# Altium PCB Solar_950_test.PcbDoc
Units mm, origin at the board's own origin, x right, y up, seen from the top; angles counter-clockwise.
Board outline 75 x 60 mm, 2 copper layers (Top Layer, Bottom Layer), stack 1.071 mm thick; 43 components, 17 nets, 105 pads, 2 vias.
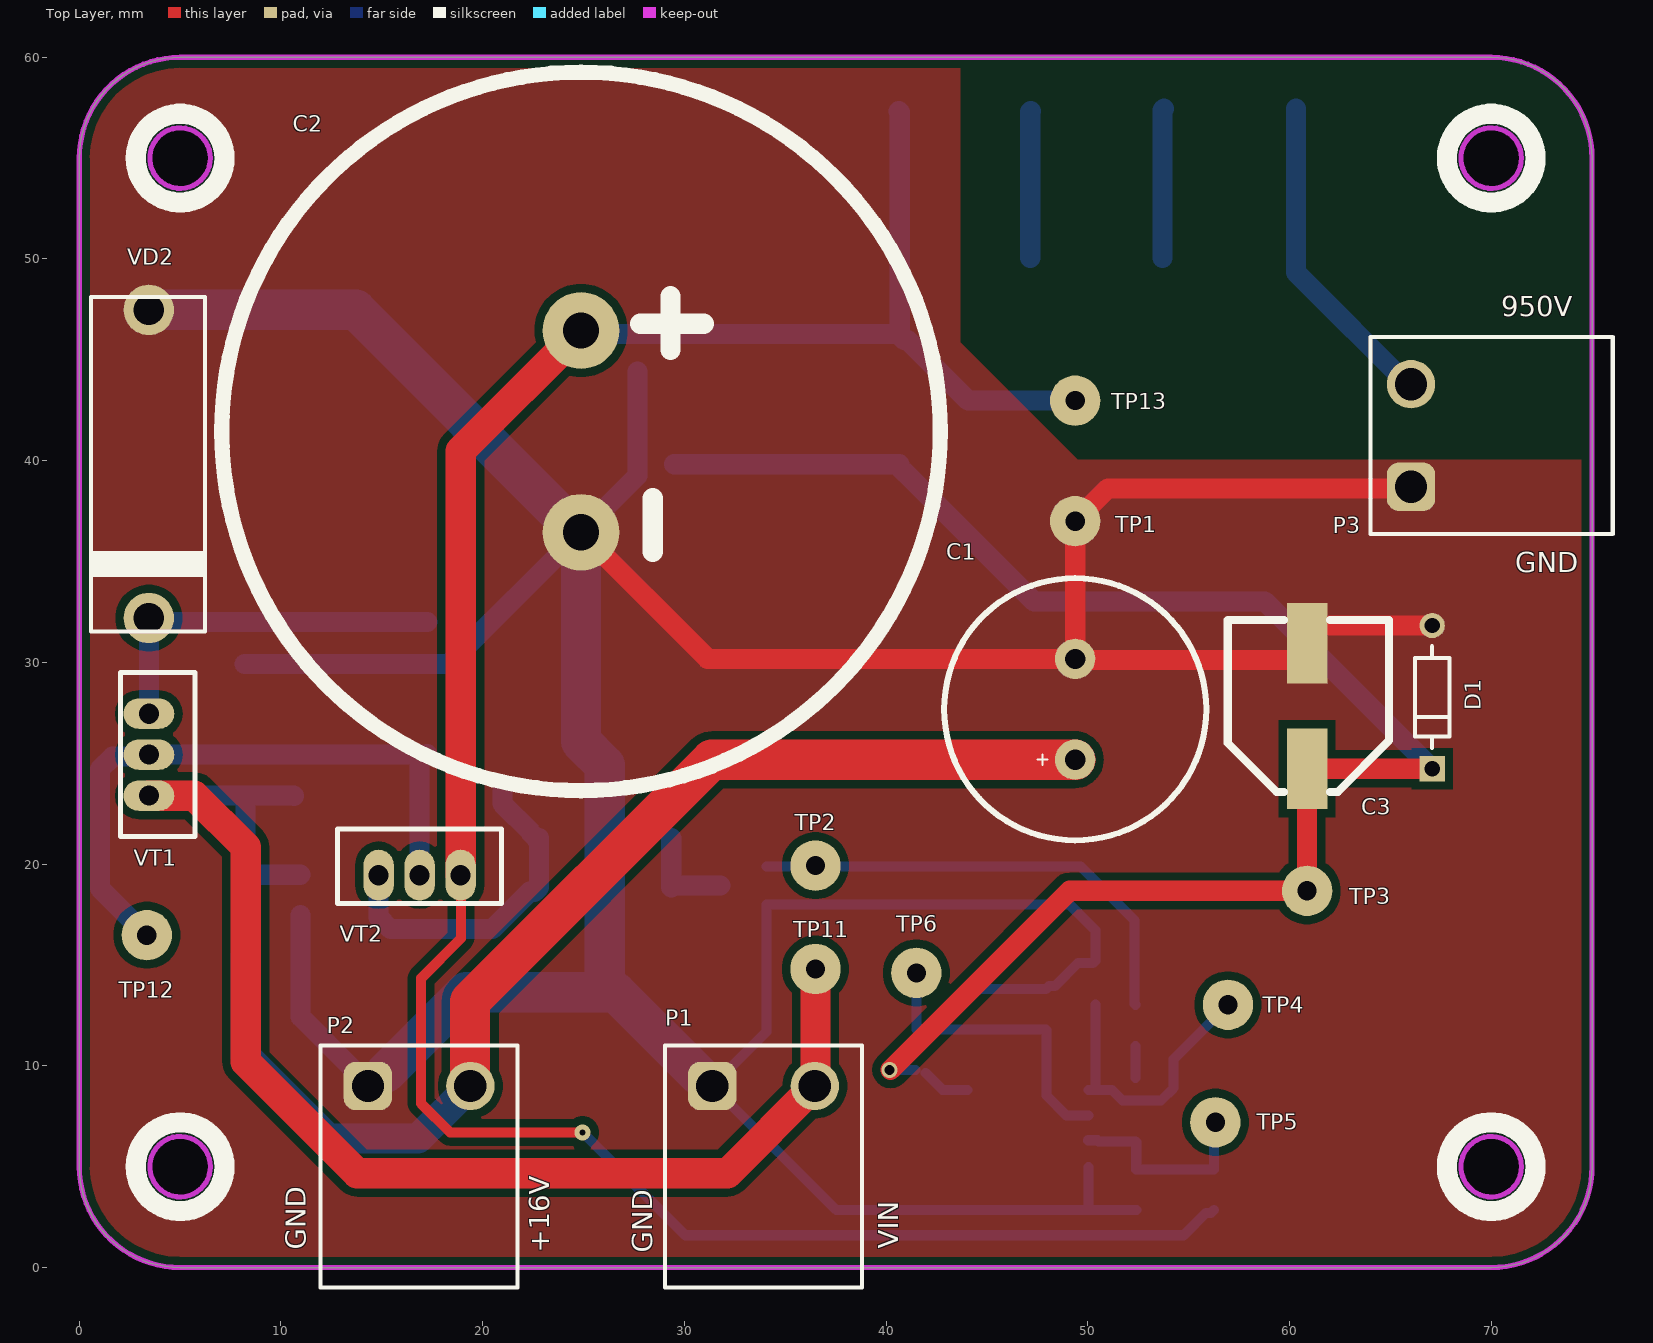
[diagram p0: Top Layer view]
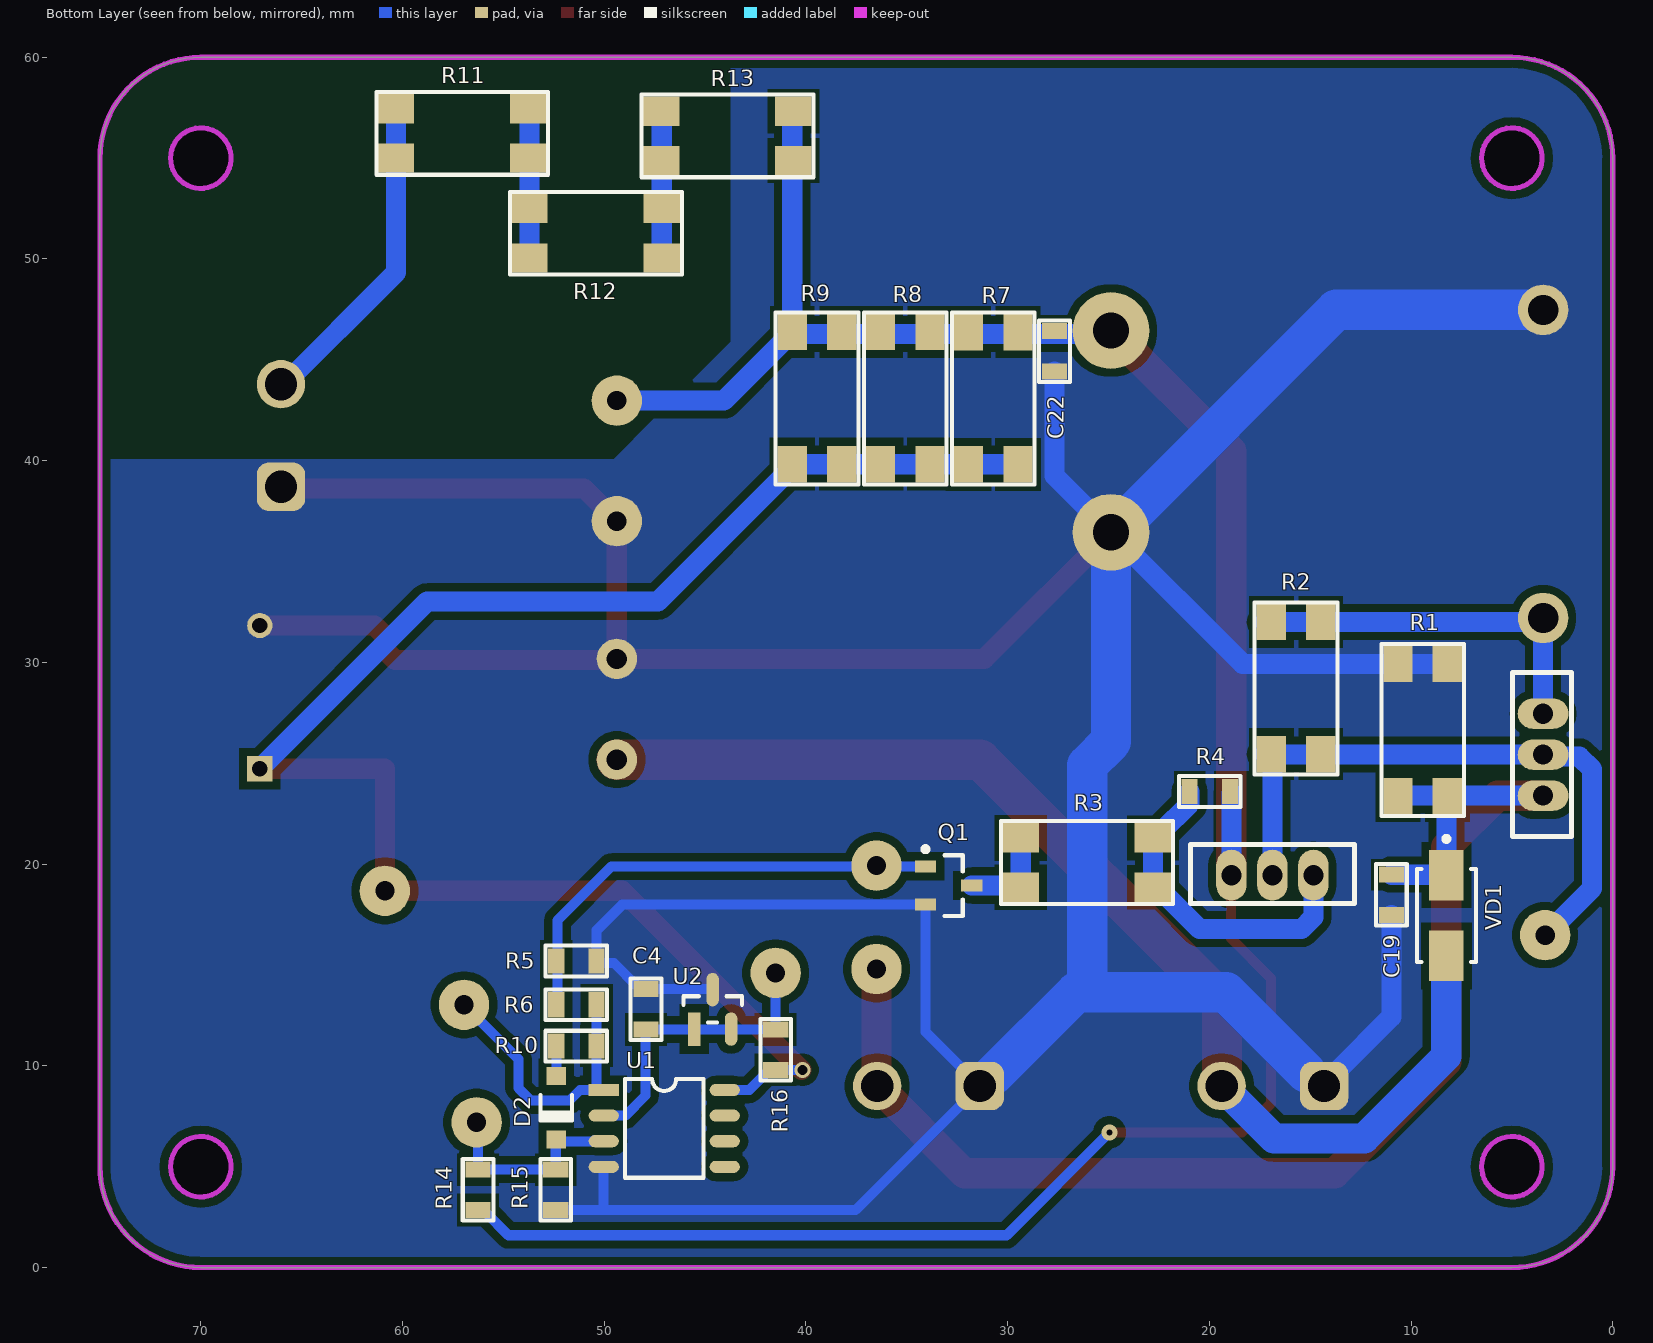
[diagram p1: Bottom Layer view, seen from below]
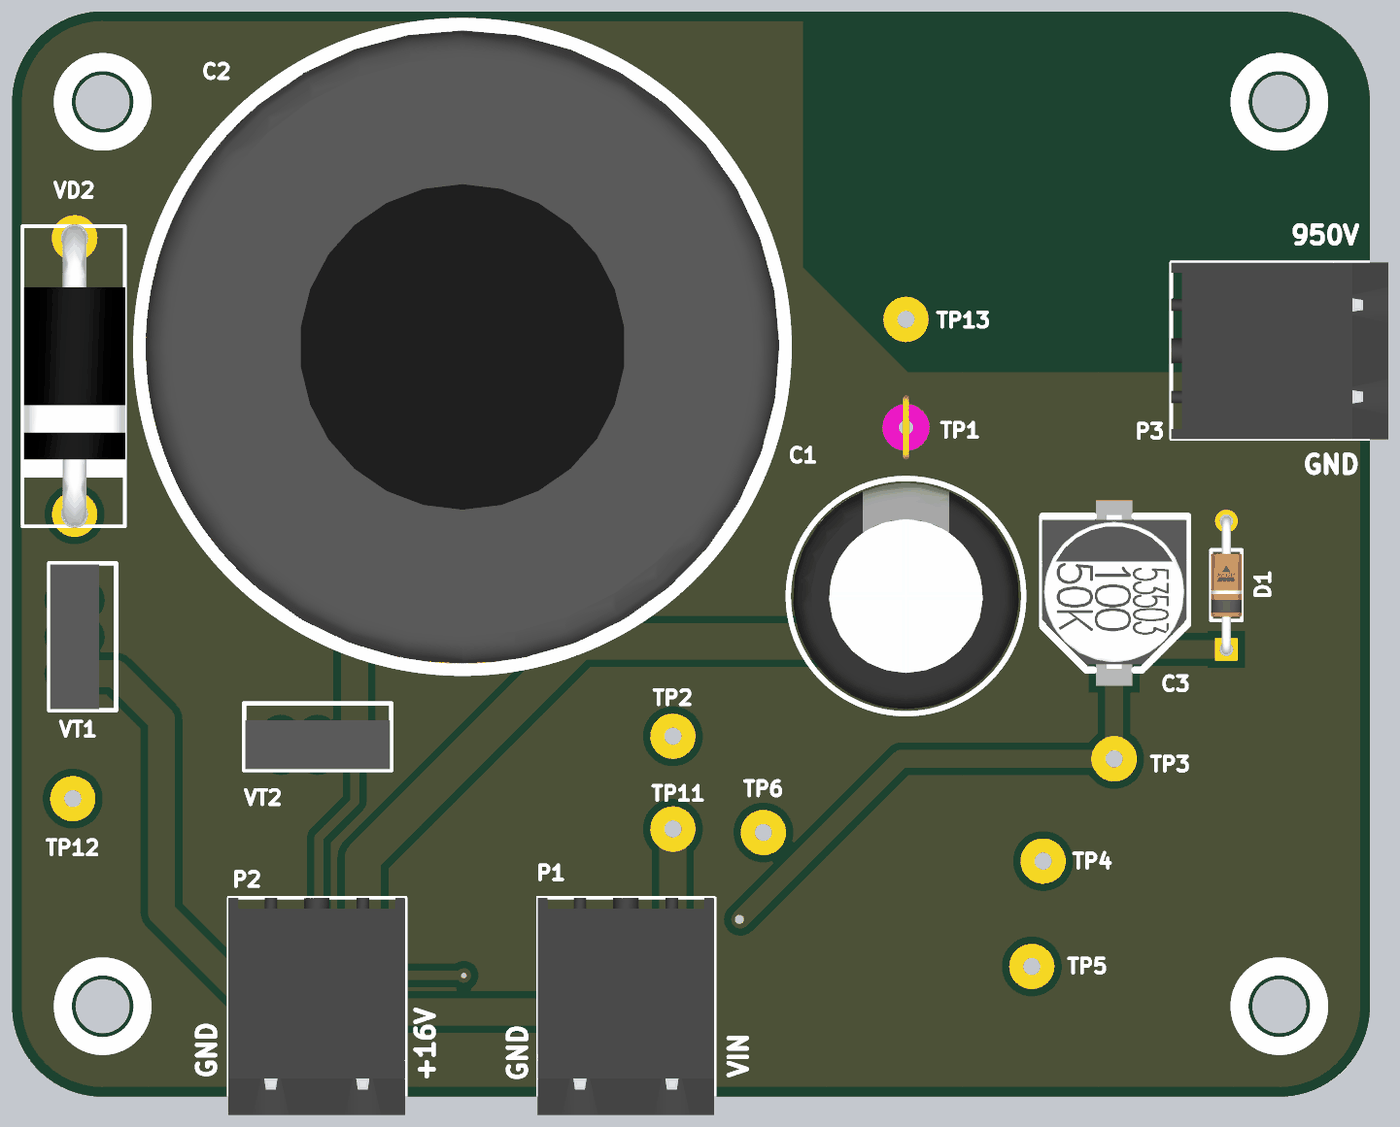
[diagram p2: 3D render of the assembled board from above, using the file's embedded part models]
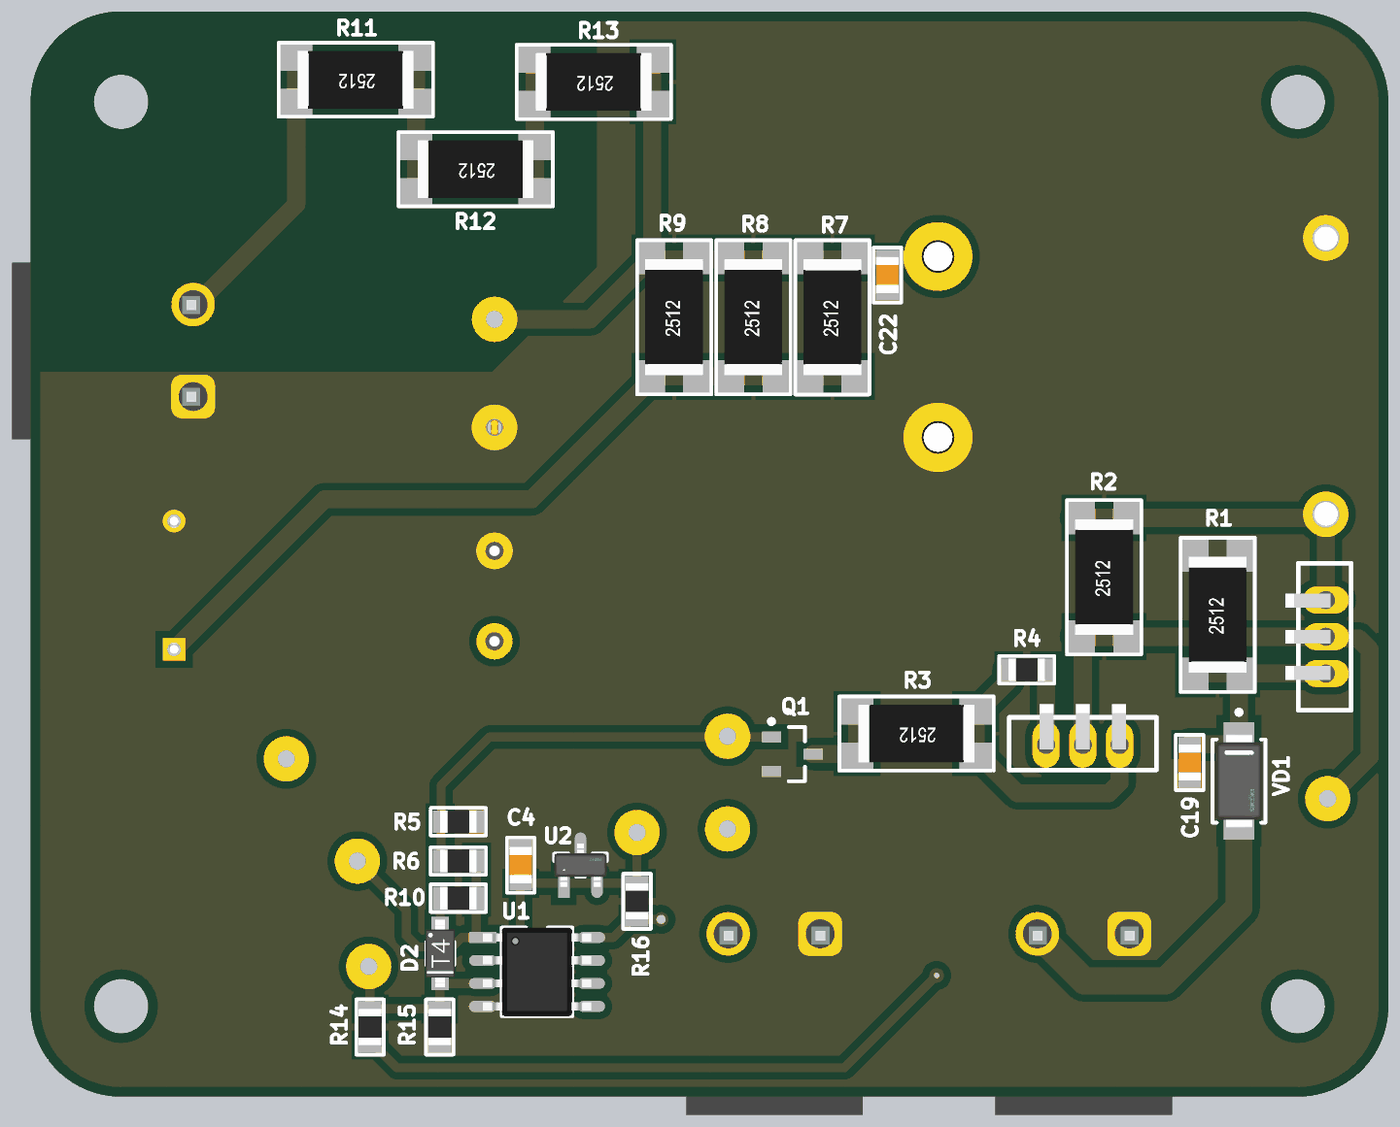
[diagram p3: 3D render of the assembled board from below, using the file's embedded part models]

## Layer stack, top to bottom
Top Solder: solder mask 0.0102, Solder Resist, Dk 3.5
Top Layer: signal copper 0.0356
Dielectric 1: dielectric 1, FR-4, Dk 4.8
Bottom Layer: signal copper 0.0356
Bottom Solder: solder mask 0.0102, Solder Resist, Dk 3.5

## Board outline
0,5 ccw(c5,5) 5,0 70,0 ccw(c70,5) 75,5 75,4.95 75,55 ccw(c70,55) 70,60 5,60 ccw(c5,55) 0,55
cut-out: 68.5,55 ccw(c70,55) 70,53.5 ccw(c70,55) 71.5,55 ccw(c70,55) 70,56.5 ccw(c70,55)
cut-out: 68.5,5 ccw(c70,5) 70,3.5 ccw(c70,5) 71.5,5 ccw(c70,5) 70,6.5 ccw(c70,5)
cut-out: 4.996,53.496 cw(c4.996,54.996) 3.496,54.996 cw(c4.996,54.996) 4.996,56.496 cw(c4.996,54.996) 6.496,54.996 cw(c4.996,54.996)
cut-out: 3.5,5 ccw(c5,5) 5,3.5 ccw(c5,5) 6.5,5 ccw(c5,5) 5,6.5 ccw(c5,5)

## Design rules (kind name [scope] priority, off if disabled: settings)
Clearance Clearance_1 [All vs InNet('GND_1')] p1: gap=0.2 ignorepadtopadclearanceinfootprint=FALSE
Clearance [All vs InNet('GND')] p2: gap=0.4 ignorepadtopadclearanceinfootprint=FALSE except(0.2: Arc-Hole Text-Text Text-Hole)
ComponentClearance [All] p1: gap=-3 collisioncheckmode=3 verticalgap=0.254 showdistances=FALSE
DiffPairsRouting [All] p1: maxlimit=0.254 minlimit=0.254 mostfreqgap=0.254 substack1={A23D90DD-733B-49C5-8102-56B3D284E3A0} toplayer_{a23d90dd-733b-49c5-8102-56b3d284e3a0}_minwidth=0.381 toplayer_{a23d90dd-733b-49c5-8102-56b3d284e3a0}_maxwidth=0.381 toplayer_{a23d90dd-733b-49c5-8102-56b3d284e3a0}_prefwidth=0.381 bottomlayer_{a23d90dd-733b-49c5-8102-56b3d284e3a0}_minwidth=0.381 bottomlayer_{a23d90dd-733b-49c5-8102-56b3d284e3a0}_maxwidth=0.381 bottomlayer_{a23d90dd-733b-49c5-8102-56b3d284e3a0}_prefwidth=0.381 toplayer_minwidth=0.381 toplayer_maxwidth=0.381 toplayer_prefwidth=0.381 bottomlayer_minwidth=0.381 bottomlayer_maxwidth=0.381 bottomlayer_prefwidth=0.381 substack2={0B3DB408-A969-412D-8C07-BA8AE97219D9} toplayer_{0b3db408-a969-412d-8c07-ba8ae97219d9}_minwidth=0.381 toplayer_{0b3db408-a969-412d-8c07-ba8ae97219d9}_maxwidth=0.381 toplayer_{0b3db408-a969-412d-8c07-ba8ae97219d9}_prefwidth=0.381 bottomlayer_{0b3db408-a969-412d-8c07-ba8ae97219d9}_minwidth=0.381 bottomlayer_{0b3db408-a969-412d-8c07-ba8ae97219d9}_maxwidth=0.381 bottomlayer_{0b3db408-a969-412d-8c07-ba8ae97219d9}_prefwidth=0.381 substack3={378827E6-B38F-4565-9D2F-710D8D441C30} toplayer_{378827e6-b38f-4565-9d2f-710d8d441c30}_minwidth=0.381 toplayer_{378827e6-b38f-4565-9d2f-710d8d441c30}_maxwidth=0.381 toplayer_{378827e6-b38f-4565-9d2f-710d8d441c30}_prefwidth=0.381 bottomlayer_{378827e6-b38f-4565-9d2f-710d8d441c30}_minwidth=0.381 bottomlayer_{378827e6-b38f-4565-9d2f-710d8d441c30}_maxwidth=0.381 bottomlayer_{378827e6-b38f-4565-9d2f-710d8d441c30}_prefwidth=0.381 substack4={1E65D4A7-266F-4925-B814-5E9C4A66F8EE} toplayer_{1e65d4a7-266f-4925-b814-5e9c4a66f8ee}_minwidth=0.381 toplayer_{1e65d4a7-266f-4925-b814-5e9c4a66f8ee}_maxwidth=0.381 toplayer_{1e65d4a7-266f-4925-b814-5e9c4a66f8ee}_prefwidth=0.381 bottomlayer_{1e65d4a7-266f-4925-b814-5e9c4a66f8ee}_minwidth=0.381 bottomlayer_{1e65d4a7-266f-4925-b814-5e9c4a66f8ee}_maxwidth=0.381 bottomlayer_{1e65d4a7-266f-4925-b814-5e9c4a66f8ee}_prefwidth=0.381 substack5={93C5D03E-862D-45F8-9871-970EEA9B3F11} toplayer_{93c5d03e-862d-45f8-9871-970eea9b3f11}_minwidth=0.381 toplayer_{93c5d03e-862d-45f8-9871-970eea9b3f11}_maxwidth=0.381 toplayer_{93c5d03e-862d-45f8-9871-970eea9b3f11}_prefwidth=0.381 bottomlayer_{93c5d03e-862d-45f8-9871-970eea9b3f11}_minwidth=0.381 bottomlayer_{93c5d03e-862d-45f8-9871-970eea9b3f11}_maxwidth=0.381 bottomlayer_{93c5d03e-862d-45f8-9871-970eea9b3f11}_prefwidth=0.381 maxuncoupledlength=12.7
Height [All] p1: minheight=0 maxheight=80 prefheight=33
HoleSize [All] p1: absolutevalues=TRUE maxlimit=6 minlimit=0.01 maxpercent=80.000 minpercent=20.000
HoleToHoleClearance [All] p1: gap=0.1 allowstackedmicrovias=TRUE
MinimumSolderMaskSliver [All] p1: minsoldermaskwidth=0.1
PlaneClearance [All] p1: clearance=0.7
PlaneConnect [All] p1: planeconnectstyle=Direct reliefexpansion=0.5 reliefentries=4 reliefconductorwidth=0.5 reliefairgap=0.15
PolygonConnect VQFN20 [HasFootprint('VQFN20')] p1: connectstyle=Direct reliefconductorwidth=0.254 reliefentries=4 polygonreliefangle="90 Angle" airgapwidth=0.254
PolygonConnect [All] p2: connectstyle=Direct reliefconductorwidth=0.3 reliefentries=4 polygonreliefangle="90 Angle" airgapwidth=0.15
RoutingVias [All] p1: holewidth=0.1 width=0.1 viastyle="Through Hole" minholewidth=0 minwidth=0.3 maxholewidth=2 maxwidth=4
ShortCircuit [All] p1: allowed=TRUE
SilkToSolderMaskClearance [IsPad] p1: minsilkscreentomaskgap=0.1 clearancetoexposedcopper=TRUE
SolderMaskExpansion SolderMaskExpansion_Via [IsVia] p1: expansion=0.102 istentingtop=TRUE
SolderMaskExpansion [All] p2: expansion=0.01 istentingtop=FALSE
UnRoutedNet [All] p1: checkbadconnections=TRUE
Width [All] p1: maxlimit=5 minlimit=0.2 preferedwidth=0.3 substack1={A23D90DD-733B-49C5-8102-56B3D284E3A0} substack2={0B3DB408-A969-412D-8C07-BA8AE97219D9} substack3={378827E6-B38F-4565-9D2F-710D8D441C30} substack4={1E65D4A7-266F-4925-B814-5E9C4A66F8EE} substack5={93C5D03E-862D-45F8-9871-970EEA9B3F11}
19 further rules are at their usual default settings.

## Components (designator, comment, footprint, x,y, rotation, side; value= is the part's Value field where it differs from the comment)
C1 "1000uF 25V" CAPPOL-12x25 49.375,27.675 r90 top
C2 "4700uF_100V" CAPPOL_35x60 24.875,41.45 r270 top locked
C3 "1000uF_10V" CAP_SMD_Size_E 60.875,27.902 r270 top
C4 "1uF_16V" CAP-0805 47.925,12.8 r270 bottom
C19 "1uF_50V" CAP-0805 10.975,18.475 r270 bottom
C22 "1uF 100V" CAP-0805 27.675,45.425 r90 bottom
D1 "5,6V" FP-SB-V-3906_04-031_4-MFG 67.075,28.275 r90 top
D2 "1N4148" DIOD-SOD123-2_V 52.375,7.919 r270 bottom
P1 "691701530002B" 691701530002B 33.925,5 r0 top
P2 "691701530002B" 691701530002B 16.85,5 r0 top
P3 "691701530002B" 691701530002B 70.025,41.25 r90 top locked
Q1 "MMBT5551" INF-SOT23_N 32.925,18.938 r180 bottom
R1 "100**" RES-2512 9.425,26.65 r90 bottom
R2 "100" RES-2512 15.7,28.725 r90 bottom
R3 "1K" RES-2512 26.075,20.075 r0 bottom
R4 "10K" RES-0805 19.975,23.6 r0 bottom
R5 "20K" RES-0805 51.375,15.2 r180 bottom
R6 "1K" RES-0805 51.375,13.026 r0 bottom
R7 "10K" RES-2512 30.714,43.095 r90 bottom
R8 "10K" RES-2512 35.075,43.1 r90 bottom
R9 "10K" RES-2512 39.45,43.1 r90 bottom
R10 "10K" RES-0805 51.375,10.975 r180 bottom
R11 "100K" RES-2512 57.05,56.225 r0 bottom
R12 "100K" RES-2512 50.425,51.275 r0 bottom
R13 "100K" RES-2512 43.9,56.1 r0 bottom
R14 "100K" RES-0805 56.25,3.85 r270 bottom
R15 "3K9" RES-0805 52.4,3.85 r90 bottom
R16 "1K" RES-0805 41.5,10.8 r270 bottom
TP1 "Test_Point_PCB" Pin_Test_Point(Pink) 49.375,37 r0 top
TP2 "Test_Point_PCB" Test_Point 36.5,19.925 r0 top
TP3 "Test_Point_PCB" Test_Point 60.875,18.675 r0 top
TP4 "Test_Point_PCB" Test_Point 56.95,13.025 r0 top
TP5 "Test_Point_PCB" Test_Point 56.325,7.2 r0 top
TP6 "Test_Point_PCB" Test_Point 41.5,14.604 r0 top
TP11 "" Test_Point 36.5,14.8 r90 top
TP12 "Test_Point_PCB" Test_Point 3.35,16.475 r90 top
TP13 "Test_Point_PCB" Test_Point 49.375,42.975 r90 top
U1 "LM358DRG" SO8-150 47.025,6.9 r180 bottom
U2 "" TL431_SOT-23-3(A) 44.625,12.798 r90 bottom
VD1 "US1G" US1G_SMA 8.25,17.45 r270 bottom
VD2 "18V" DO-201 3.45,39.95 r90 top
VT1 "BD139(npn)" TO-126 3.45,25.425 r90 top
VT2 "BD140(pnp)" TO-126 16.875,19.45 r180 top

## Footprints (in the part's own frame and the unit in brackets; to place one, negate y for a bottom-side part, rotate by r counter-clockwise, add the part's x,y. Pads: shape width x height; smd on the part's side, far side on the other; paste and mask are expansions set on the pad)
691701530002B [mm] "THR - 5,08mm - PCB Horizontal Open - 02p"
  rrect50% 2.4x2.4 hole 1.6: 1(-2.54,4)
  round 2.4 hole 1.6: 2(2.54,4)
  silkscreen extent -4.88,-6 4.88,6, body extent -4.9,-6 4.86,6, height 8.6
CAP-0805 [mm]
  rect 0.8x1.25 smd mask+0.015: 1(-1,0) 2(1,0)
  silkscreen extent -1.52,-0.76 1.52,0.76, body extent -1,-0.62 1,0.63, height 0.8
CAP_SMD_Size_E [mm]
  rect 4x2 smd: 1(3.175,0) 2(-3.048,0)
  silkscreen extent -4.19,-3.94 4.32,4.06, body extent -4.25,-4 4.25,4, height 10.59
CAPPOL-12x25 [mm]
  round 2 hole 1: 1(-2.5,0) 2(2.5,0)
  silkscreen extent -6.5,-6.5 6.5,6.5, body extent -6.25,-6.25 6.25,6.25, height 25
CAPPOL_35x60 [mm]
  round 3.8 hole 1.8: 1(-5,0) 2(5,0)
  silkscreen extent -17.81,-17.81 17.81,17.81, body extent -17.5,-17.5 17.51,17.5, height 60
DIOD-SOD123-2_V [mm] "SOD123, 2-Leads, Body 2.7x1.55mm, Height 1.45mm"
  rect 0.9x0.95 smd: 1(1.575,0) 2(-1.575,0)
  silkscreen extent -0.64,-0.83 0.64,0.77, body extent -1.88,-0.8 1.88,0.8, height 1.3
DO-201 [mm]
  round 2.5 hole 1.5: 1(-7.75,0) 2(7.525,0)
  silkscreen extent -8.42,-2.78 8.18,2.88, body extent -8.4,-2.79 8.16,2.79, height 7.6
FP-SB-V-3906_04-031_4-MFG [mm]
  rect 1.25x1.25 hole 0.75 paste-2539.97 mask+0: 1(-3.55,0)
  round 1.25 hole 0.75 paste-2539.97 mask+0: 2(3.55,0)
  silkscreen extent -2.52,-0.85 2.52,0.85, body extent -4.28,-0.95 4.28,0.95, height 0.25
INF-SOT23_N [mm] "SOT23, 3-Leads, Body 2.9x1.3 mm, Pitch 0.95 mm, IPC Medium Density"
  rect 1.05x0.6 smd: 1(-1.15,0.95) 2(-1.15,-0.95) 3(1.15,0)
  silkscreen extent -1.28,-1.5 0.7,1.92, body extent -0.7,-1.5 0.7,1.5, height 1.1
Pin_Test_Point(Pink) [mm]
  round 2.5 hole 0.95: 1(0,0)
  body extent -1.3,-1.78 1.3,1.78, height 6.93
RES-0805 [mm]
  rect 0.8x1.25 smd mask+0.015: 1(-1,0) 2(1,0)
  silkscreen extent -1.52,-0.76 1.52,0.76, body extent -1,-0.62 1,0.63, height 0.6
RES-2512 [mm]
  rect 1.8x1.45 smd: 1(-3.275,-1.225) 1(-3.275,1.225) 2(3.275,-1.225) 2(3.275,1.225)
  silkscreen extent -4.28,-2.05 4.25,2.05, body extent -3.2,-1.6 3.2,1.6, height 0.6
SO8-150 [mm]
  rect 1.5x0.6 smd: 1(-3,1.9)
  oval 1.5x0.6 smd: 2(-3,0.63) 3(-3,-0.64) 4(-3,-1.91) 5(3,-1.91) 6(3,-0.64) 7(3,0.63) 8(3,1.9)
  silkscreen extent -1.95,-2.45 1.95,2.45, body extent -3,-2.45 3,2.45, height 1.7
Test_Point [mm]
  round 2.5 hole 0.95: 1(0,0)
TL431_SOT-23-3(A) [mm]
  rect 1.659x0.627 smd paste+0 mask+0: 1(-0.977,0.915)
  rrect100% 1.659x0.627 smd paste+0 mask+0: 2(-0.977,-0.915) 3(0.977,0)
  silkscreen extent -0.65,-1.45 0.65,1.45, body extent -1.2,-1.45 1.2,1.45, height 1.1
TO-126 [mm]
  oval 1.5x2.524 hole 1: 1(-2.032,0) 2(0,0) 3(2.032,0)
  silkscreen extent -4.06,-2.29 4.06,1.4, body extent -4,-2.25 4,1.35, height 15.5
US1G_SMA [mm]
  rect 2.5x1.7 smd paste+0 mask+0: 1(-2,0) 2(2,0)
  silkscreen extent -3.92,-1.46 2.3,1.46, body extent -2.6,-1.3 2.6,1.3, height 2.4

## Part data
C1 C2: library part CAP-POLAR
C3: library part CAP_POL_SMD
C4 C19 C22: library part CAP-NON-POLAR
D1: library part CMP-02541-000026-1, "DIODE ZENER 8.2V 500MW DO35", Case/Package=DO-35, Max Operating Temperature=175°C, Max Power Dissipation=500mW, Max Reverse Leakage Current=100nA, Min Operating Temperature=-65°C, Package Quantity=30000, Test Current=5mA, Tolerance=2%, Zener Voltage=8.2V, Contact Plating=Tin, Element Configuration=Single, ESD Protection=No, Impedance=7R, Lead Free="Lead Free", Mount="Through Hole", Number of Pins=2, Packaging="Ammo Pack", Power Dissipation=500mW, Radiation Hardening=No, RoHS Compliant=Yes, Series="Automotive, AEC-Q101", Voltage Tolerance=2%
P1 P2 P3: "WR-TBL Series 7015B Open Horizontal PCB Header, SMT, pitch 5.08mm, 2p", Manufacturer="Wurth Elektronik", Operating Temperature Max=105°C, Operating Temperature Min=-40°C, Rated Current=10A, Working Voltage=300V, Application=Pluggable, Category="Terminal Blocks", ComponentLink1Description="Website Link", ComponentLink1URL=https://www.we-online.com/redexpert/article/691701530002B?ad, ComponentLink2Description="Datasheet Link", ComponentLink2URL=https://www.we-online.com/redexpert/spec/691701530002B?ad, Manufacturer Part Number=691701530002B, Match Code=WR-TBL, Modularity=No, Mount="Surface Mount", Number of Pins=2, Number of Rows=1, Orientation=Horizontal, Packaging=Box, Pitch=5.08mm
Q1: library part BC847C_Infineon, "NPN Silicon AF Transistor, 45 V VCEO, 100 mA IC, SOT23, Reel, Green", Manufacturer=Infineon, PartNumber=BC847C, ComponentLink1Description="Manufacturer URL", ComponentLink1URL=http://www.infineon.com/, ComponentLink2Description=Datasheet, ComponentLink2URL=http://www.infineon.com/dgdl/bc847series_bc848series_bc849series_bc850series.pdf?folderId=db3a304314dca389011541d30fa21656&fileId=db3a304314dca389011541d4630a1657, ComponentLink3Description="Package Specification", ComponentLink3URL=http://www.infineon.com/dgdl/SOT23-Package_Overview.pdf?folderId=db3a30431936bc4b0119532290053c66&fileId=db3a30431936bc4b0119533468123c85, fT (typ)="250Â MHz", Green=TRUE, IBM (max)="200Â mA", IC (max)="100Â mA", ICBO (max)="15Â nA", ICM (max)="200Â mA", Mounting Technology="Surface Mount", PackageDescription="3-Pin Small Outline Transistor Package, 1.3 x 2.9 mm Body, 0.95 mm Pitch", PackageReference=SOT23, PackageVersion=Apr-08, Packing=Reel, Polarity=NPN, Ptot (max)="330Â mW", VCBO (max)="50Â V", VCEO (max)="45Â V", VEBO (max)="6Â V"
R1: library part RES-CONST, "100"
R2 R3 R4 R5 R6 R7 R8 R9 R10 R11 R12 R13 R14 R15 R16: library part RES-CONST
TP1 TP2 TP3 TP4 TP5 TP6 TP11 TP12 TP13: library part TP_PCB?, "Test_Point"
U2: library part TL431_SOT-23-3, "TL431_SOT-23-3"
VD2: library part ZENER
VT1: library part BD139
VT2: library part BD140

## Via types
v1: diameter 0.8, hole 0.3, Top Layer to Bottom Layer, tented both sides, 1 vias
v2: diameter 0.8, hole 0.5, Top Layer to Bottom Layer, tented both sides, 1 vias

## Nets (pads, with @x,y where several pads share a name; then routed paths per layer and width w, separated by ;. In a path a pad name is that pad's centre, name@x,y a point inside that pad or via, vN(x,y) a via of type N, cw(c..) or ccw(c..) an arc to the next point about the centre after c; other vN are vias at no path point)
+950V: P3.2 R11.2 | length 16.3
  Bottom Layer w1: R11.2@60.325,57.45 60.325,55 60.325,49.325 P3.2@66.072,43.578
GND: C1.2 C2.2 C3.2 C4.1 C19.2 C22.1 D1.2 P1.1 P2.1 P3.1 Q1.2 R1.2 R5.2 R15.1 TP1.1 U1.4 U2.3 VD2.2 | length 236.9
  Top Layer w1: C2.2 31.15,30.175 C1.2 ; P3.1 65.94,38.625 51,38.625 TP1.1 C1.2 ; D1.2 61.375,31.825 60.875,31.325 60.875,30.625 60.375,30.125 49.425,30.125 C1.2
  Bottom Layer w0.5: U2.3 44.65,13.8 C4.1 48.075,13.95 48.375,13.95 49.518,15.093 50.268,15.093 R5.2 50.375,16.725 49.112,17.988 Q1.2 34.075,11.69 P1.1 37.535,2.85 R15.1 ; U1.4 50.025,2.851 50.026,2.85
  Bottom Layer w1: R1.2@8.2,29.925 10.65,29.925 18.35,29.925 C2.2 27.675,39.25 C22.1 ; C19.2 10.975,12.425 13.61,9.79 13.61,9.754 14.274,9.09 P2.1@14.31,9.09
  Bottom Layer w2: VD2.2 13.7,47.475 C2.2@24.725,36.45 ; P2.1@15.205,9.68 19.175,13.65 26.05,13.65 ; C2.2 24.875,26.075 26.05,24.9 26.05,13.65 ; P1.1@30.709,9.541 26.6,13.65 26.05,13.65
NetC1_1: C1.1 P2.2 VD1.2 | length 58.2
  Top Layer w2: P2.2@19.375,8.843 19.375,13.2 31.35,25.175 C1.1
  Bottom Layer w1.5: VD1.2 8.25,10.474 12.324,6.4 16.795,6.4 P2.2@19.393,8.997
NetC2_1: C2.1 C22.2 R4.1 R7.2 R8.2 R9.2 R13.1 R14.2 TP13.1 VT2.1 | length 125
  Top Layer w0.5: VT2.1@18.925,19.432 18.925,16.318 16.95,14.343 16.95,8.125 18.375,6.7 v1(24.95,6.7)
  Top Layer w1.5: VT2.1 18.907,40.482 C2.1
  Bottom Layer w0.5: v1(24.95,6.7) 30.05,1.6 54.75,1.6 55.85,2.7 56.1,2.7 R14.2
  Bottom Layer w1: VT2.1 R4.1@18.907,23.532 ; C2.1 25.045,46.28 33.85,46.28 R9.2@40.536,46.28 ; R13.1@40.625,57.325 40.675,57.275 40.675,46.375 40.675,46.2 40.9,45.975 41.075,45.975 44.075,42.975 TP13.1@49.276,42.975
NetC3_1: C3.1 D1.1 R7.1 R8.1 R9.1 R16.2 TP3.1 U1.8 | length 84.2
  Top Layer w1: v2@40.225,9.8 49.1,18.675 TP3.1 C3.1 60.877,24.725 D1.1
  Bottom Layer w0.5: v2(40.175,9.8) R16.2@41.45,9.8 ; R16.2@41.958,9.65 42.808,8.8 U1.8
  Bottom Layer w1: R7.1@29.489,39.82 31.939,39.82 33.85,39.82 36.3,39.82 38.225,39.82 40.67,39.82 40.67,39.655 40.9,39.425 40.925,39.425 47.325,33.025 58.775,33.025 D1.1
NetC4_2: C4.2 R16.1 TP6.1 U1.2 U2.1 U2.2 | length 14.1
  Bottom Layer w0.5: R16.1 41.513,11.812 41.513,13.888 TP6.1@41.525,13.9 ; R16.1@41.687,11.8 45.54,11.8 C4.2 47.95,11.775 47.95,8.525 48.945,7.53 U1.2
NetC19_1: C19.1 P1.2 R1.1 TP11.1 VD1.1 VT1.1 | length 68.5
  Top Layer w1.5: VT1.1 5.707,23.393 8.25,20.85 8.25,10.2 13.775,4.675 32.14,4.675 P1.2 36.5,9.035 TP11.1
  Bottom Layer w1: VT1.1 10.632,23.393 R1.1@10.65,23.375 ; R1.1@8.2,23.375 8.25,23.325 VD1.1 8.275,19.475 C19.1
NetD2_1: D2.1 R14.1 R15.2 TP5.1 U1.3 | length 10
  Bottom Layer w0.5: U1.3@50,6.31 50.477,6.31 50.537,6.25 52.375,6.25 52.4,6.225 R15.2 R14.1 56.25,7.125 TP5.1
NetD2_2: D2.2 R10.1 | length 1.6
  Bottom Layer w0.5: D2.2@52.375,9.4 R10.1
NetQ1_1: Q1.1 R5.1 R6.2 TP2.1 | length 23.6
  Bottom Layer w0.5: Q1.1 36.5,19.888 39.005,19.888 49.637,19.888 52.325,17.2 52.325,15.2 52.325,13.076 R6.2
NetQ1_3: Q1.3 R3.2 | length 4.9
  Bottom Layer w1: R3.2@29.35,21.3 29.35,18.85 29.438,18.938 Q1.3
NetR2_1: R2.1 TP12.1 VT1.2 VT2.2 | length 31.5
  Bottom Layer w1: TP12.1 1.025,18.8 1.025,24.7 1.654,25.329 3.354,25.329 VT1.2 14.475,25.425 R2.1@16.925,25.425 ; VT2.2 16.875,25.075 R2.1@17.25,25.45
NetR2_2: R2.2 VD2.1 VT1.3 | length 18.6
  Bottom Layer w1: VT1.3 VD2.1 3.65,32 14.8,32 R2.2@17.25,32
NetR3_1: R3.1 R4.2 VT2.3 | length 16.8
  Bottom Layer w1: VT2.3 14.843,17.361 15.429,16.775 20.475,16.775 22.325,18.625 22.575,18.625 22.8,18.85 22.8,21.3 22.625,21.3 22.4,21.525 22.4,21.574 20.975,22.999 R4.2
NetR6_1: R6.1 R10.2 TP4.1 U1.1 | length 14.2
  Bottom Layer w0.5: U1.1 51.2,8.8 51.725,8.275 53.632,8.275 54.25,8.893 54.25,10.325 TP4.1 ; U1.1@50.325,8.8 50.375,8.85 R10.2 R6.1
NetR11_1: R11.1 R12.2 | length 7.4
  Bottom Layer w1: R12.2@53.7,50.05 53.7,52.5 53.7,57.375 R11.1@53.775,57.45
NetR12_1: R12.1 R13.2 | length 7.3
  Bottom Layer w1: R12.1@47.15,50.05 47.15,52.5 47.15,57.3 R13.2@47.175,57.325
pads on no net: U1.5 U1.6 U1.7

## Polygon pours and split planes (outlines as drawn)
GND on Top Layer "NONET_L-01_P-001" (solid, remove dead copper, pour order 0): 0,0 0,60 43.675,60 43.675,45.875 49.5,40.05 74.95,40.05 74.975,40.075 75,40.05 75,0
GND on Bottom Layer "NONET_L-01_P-001" (solid, remove dead copper, pour order 1): 0.041,0.031 0.041,60.031 43.716,60.031 43.716,45.884 49.519,40.081 74.991,40.081 75.016,40.106 75.041,40.081 75.041,0.031

## Keep-outs
Keep-Out Layer:
  circle w0.254: c5,5 r1.5
  circle w0.254: c70,5 r1.5
  circle w0.254: c70,55 r1.5
  circle w0.254: c5,55 r1.5
  lines w0.254: 75,4.95 75,55 ccw(c70,55) 70,60 5,60 ccw(c5,55) 0,55 0,5 ccw(c5,5) 5,0 70,0 ccw(c70,5) 75,5

## Silkscreen, mask and mechanical layers (free items; w line width, h text height)
Top Overlay:
  circle w1: c5,5 r2.2
  circle w1: c70,55 r2.2
  circle w1: c5,55 r2.2
  circle w1: c70,5 r2.2
  text "950V" at 70.504,47.154 h1
  text "GND" at 71.179,34.479 h1
  text "VIN" at 40.596,0.929 h1 r90
  text "GND" at 11.225,0.885 h1 r90
  text "+16V" at 23.296,0.729 h1 r90
  text "GND" at 28.4,0.735 h1 r90